# Altium PCB PCB.PcbDoc
Units mm, origin at the board's own origin, x right, y up, seen from the top; angles counter-clockwise.
Board outline 93.98 x 53.34 mm, 2 copper layers (Top Layer, Bottom Layer); 27 components, 34 nets, 165 pads, 42 vias.
Unrouted connection lines stored in the file: 2.
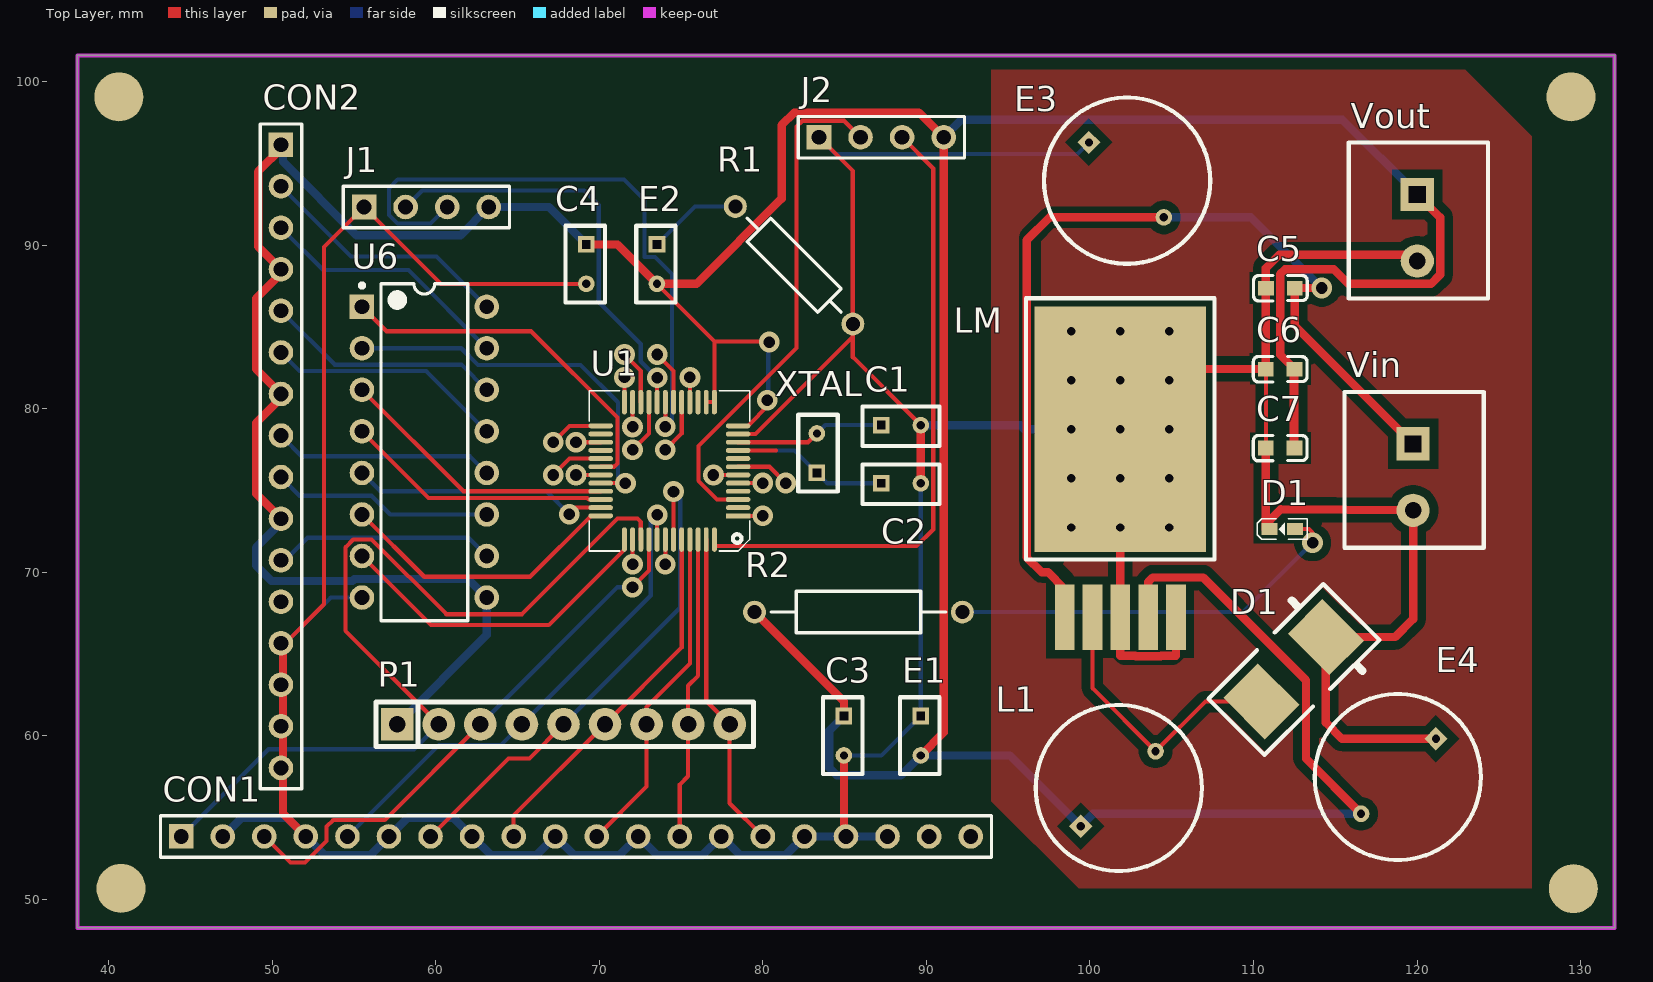
[diagram p0: Top Layer view]
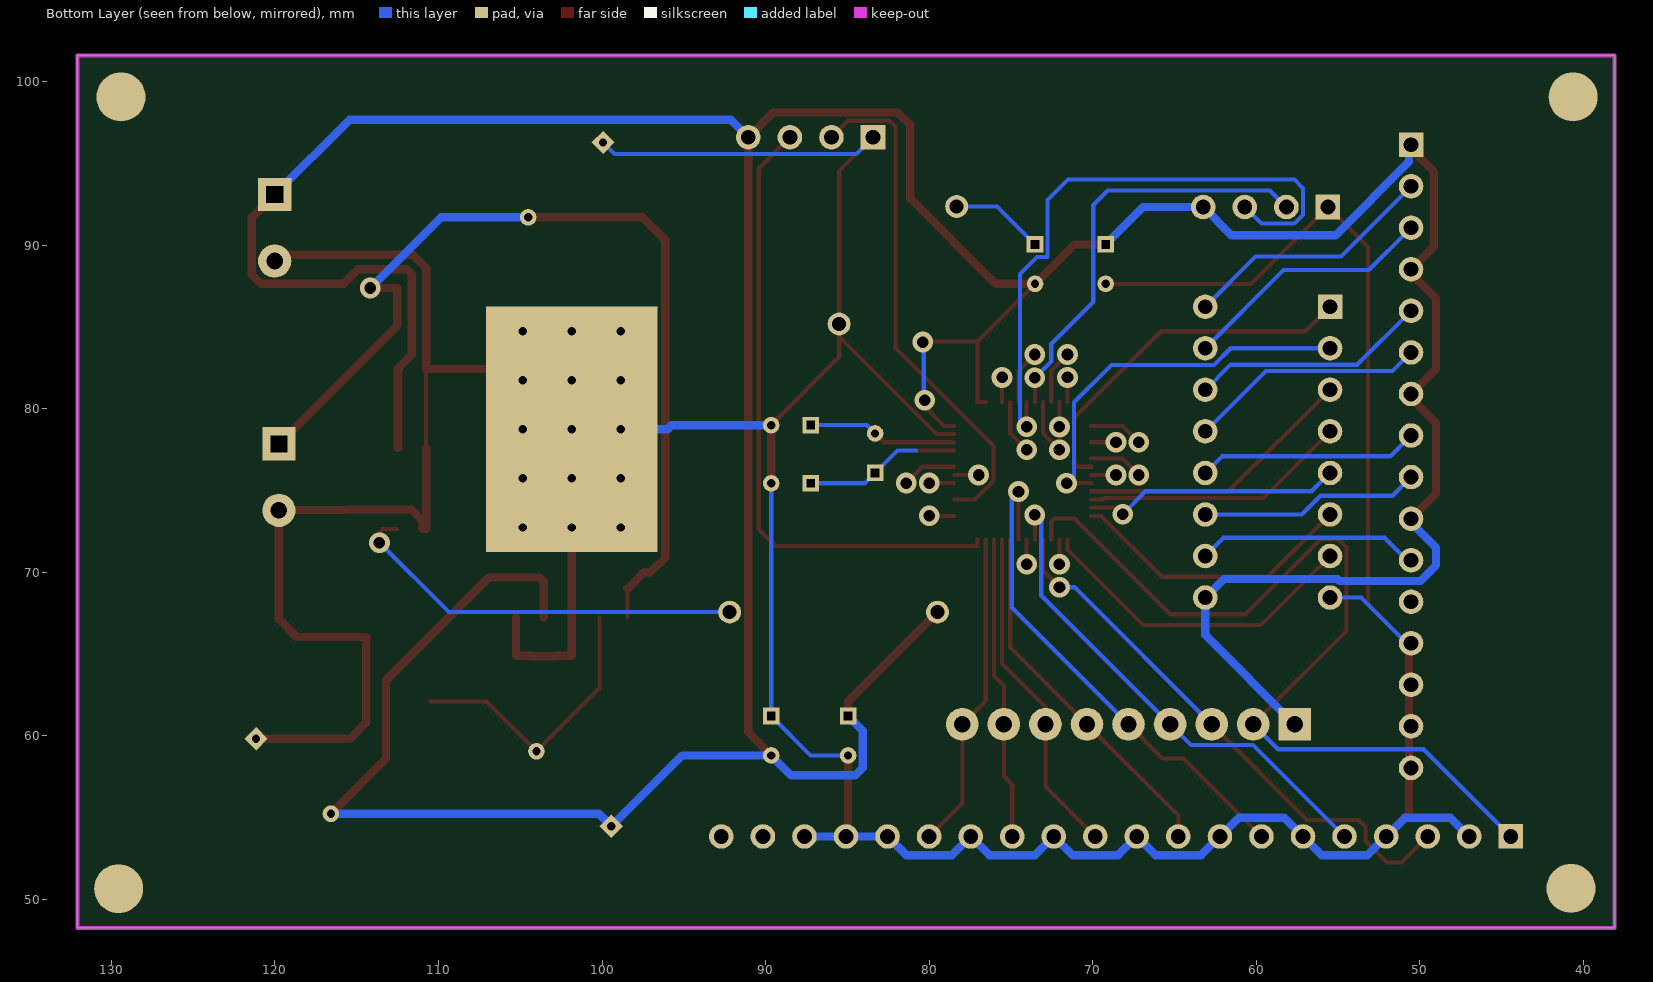
[diagram p1: Bottom Layer view, seen from below]

## Layer stack, top to bottom
Top Solder: solder mask 0.0102, Solder Resist, Dk 3.5
Top Layer: signal copper 0.0356
Dielectric 1: dielectric 0.32, FR-4, Dk 4.8
Bottom Layer: signal copper 0.0356
Bottom Solder: solder mask 0.0102, Solder Resist, Dk 3.5

## Board outline
38.1,48.26 38.1,101.6 132.08,101.6 132.08,48.26

## Design rules (kind name [scope] priority, off if disabled: settings)
Clearance [All] p1: gap=0.127 ignorepadtopadclearanceinfootprint=FALSE
PolygonConnect [All] p1: connectstyle=Relief reliefconductorwidth=0.254 reliefentries=4 polygonreliefangle="90 Angle" airgapwidth=0.254
RoutingVias [All] p1: holewidth=0.711 width=1.27 viastyle="Through Hole" minholewidth=0.711 minwidth=1.27 maxholewidth=0.711 maxwidth=1.27
SolderMaskExpansion [All] p1: expansion=0.102 istentingtop=FALSE
SupplyNets "Schematic Supply Nets_2" [InNet('GND')] p1: voltage=0.000
SupplyNets "Schematic Supply Nets" [InNet('9-24V')] p2: voltage=0.000
SupplyNets "Schematic Supply Nets_1" [InNet('RST')] p3: voltage=0.000
Width Width_2 [InNet('9-24V')] p1: maxlimit=2.54 minlimit=0.254 preferedwidth=0.508 minimp=50.000000 maximp=50.000000 favimp=50.000000
Width Width_1 [InNet('GND')] p2: maxlimit=2.54 minlimit=0.254 preferedwidth=0.508 minimp=50.000000 maximp=50.000000 favimp=50.000000
Width Width_RST [InNet('RST')] p3: maxlimit=2.54 minlimit=0.254 preferedwidth=0.508 minimp=50.000000 maximp=50.000000 favimp=50.000000
Width [All] p4: maxlimit=0.254 minlimit=0.254 preferedwidth=0.254
30 further rules are at their usual default settings.

## Components (designator, comment, footprint, x,y, rotation, side; value= is the part's Value field where it differs from the comment)
C1 "Cap" PCBComponent_1 89.662,78.994 r180 top value=30pF
C2 "Cap" PCBComponent_1 89.662,75.438 r180 top value=30pF
C3 "Cap" PCBComponent_1 84.963,58.801 r90 top value=0.1u
C4 "Cap" PCBComponent_1 69.215,87.63 r90 top value=0.1u
C5 "63V0.1u" 0603/C 111.646,87.376 r0 top
C6 "104" 0603/C 111.633,82.423 r0 top
C7 "103" 0603/C 111.633,77.597 r0 top
CON1 "Header 20" HDR1X20 44.45,53.848 r0 top
CON2 "Header 16" HDR1X16 50.546,96.139 r270 top
D1 "SS34" 100u 112.451,64.064 r225 top
D1 "LED3" LED/0603 111.76,72.644 r180 top
E1 "Cap Pol2" PCBComponent_1 89.662,58.801 r90 top value=100u
E2 "电解电容" PCBComponent_1 73.533,87.63 r90 top
E3 "Cap Pol2" Inductor 104.521,91.694 r315 top value="50v 100uF"
E4 "Cap Pol2" Inductor 116.578,55.237 r225 top value=100u
J1 "Header 4" HDR1X4 55.626,92.329 r0 top
J2 "Header 4" HDR1X4 83.439,96.599 r0 top
L1 "Inductor" Inductor 104.013,59.055 r45 top value=100uH
LM "LM2576" TO-263-5 98.454,67.24 r0 top
P1 "Header 9" P2.54/9PIN 67.818,60.706 r0 top
R1 "Res2" AXIAL-0.4 81.915,88.773 r135 top value=10K
R2 "Res Semi" AXIAL-0.5 85.852,67.564 r180 top value=2K
U1 "8A8K64S4A12" LQFP48 74.295,76.2 r180 top
U6 "MC1413" dip-16 59.309,77.343 r0 top
Vin "Vin" V 119.761,77.851 r0 top
Vout "Vout" V 120.015,93.091 r0 top
XTAL "4.0MHZ" PCBComponent_1 83.312,78.486 r270 top

## Footprints (in the part's own frame and the unit in brackets; to place one, negate y for a bottom-side part, rotate by r counter-clockwise, add the part's x,y. Pads: shape width x height; smd on the part's side, far side on the other; paste and mask are expansions set on the pad)
100u [mm]
  rect 3x3.6 smd: 1(-2.794,0) 2(2.775,0)
  silkscreen extent -4.98,-3.05 4.95,3.05
0603/C [mil]
  rect 38x35 smd: 1(-34.5,0) 2(34.5,0)
  silkscreen extent -64,-31 64,30, body extent -33,-16 30,16, height 12
AXIAL-0.4 [mm] "Axial Device, Thru-Hole; 2 Leads; 0.4 in Pin Spacing"
  round 1.4 hole 0.85: 1(-5.08,0) 2(5.08,0)
  silkscreen extent -4.06,-1.02 4.06,1.02
AXIAL-0.5 [mm] "Axial Device, Thru-Hole; 2 Leads; 0.5 in Pin Spacing"
  round 1.4 hole 0.85: 1(-6.35,0) 2(6.35,0)
  silkscreen extent -5.33,-1.27 5.33,1.27
dip-16 [mm] "DIP; 16 Leads; Row Spacing 7.62 mm; Pitch 2.54 mm"
  rect 1.5x1.5 hole 0.9: 1(-3.81,8.89)
  round 1.5 hole 0.9: 2(-3.81,6.35) 3(-3.81,3.81) 4(-3.81,1.27) 5(-3.81,-1.27) 6(-3.81,-3.81) 7(-3.81,-6.35) 8(-3.81,-8.89) 9(3.81,-8.89) 10(3.81,-6.35) 11(3.81,-3.81) 12(3.81,-1.27) 13(3.81,1.27) 14(3.81,3.81) 15(3.81,6.35) 16(3.81,8.89)
  silkscreen extent -3.93,-10.3 2.65,10.31, body extent -3.6,-10.28 3.6,10.28, height 5.08
HDR1X4 [mm]
  rect 1.5x1.5 hole 0.9: 1(0,0)
  round 1.5 hole 0.9: 2(2.54,0) 3(5.08,0) 4(7.62,0)
  silkscreen extent -1.27,-1.27 8.89,1.27
HDR1X16 [mm] "Connector; Header; 16 Position"
  rect 1.5x1.5 hole 0.9: 1(0,0)
  round 1.5 hole 0.9: 2(2.54,0) 3(5.08,0) 4(7.62,0) 5(10.16,0) 6(12.7,0) 7(15.24,0) 8(17.78,0) 9(20.32,0) 10(22.86,0) 11(25.4,0) 12(27.94,0) 13(30.48,0) 14(33.02,0) 15(35.56,0) 16(38.1,0)
  silkscreen extent -1.27,-1.27 39.37,1.27
HDR1X20 [mm] "Connector; Header; 20 Position"
  rect 1.5x1.5 hole 0.9: 1(0,0)
  round 1.5 hole 0.9: 2(2.54,0) 3(5.08,0) 4(7.62,0) 5(10.16,0) 6(12.7,0) 7(15.24,0) 8(17.78,0) 9(20.32,0) 10(22.86,0) 11(25.4,0) 12(27.94,0) 13(30.48,0) 14(33.02,0) 15(35.56,0) 16(38.1,0) 17(40.64,0) 18(43.18,0) 19(45.72,0) 20(48.26,0)
  silkscreen extent -1.27,-1.27 49.53,1.27
Inductor [mil]
  round 40 hole 20: 1(0,0)
  rect 40x40 hole 20: 2(-255,0)
  silkscreen extent -325,-200 75,200
LED/0603 [mil]
  rect 38x30 smd: 1(-31,0) 2(31,0)
  Top Layer pour cut-out: -59.29,24.17 59.21,24.17 59.21,-24.21 -59.29,-24.21 -59.29,24.17
  silkscreen extent -60,-25 60,25
LQFP48 [mm]
  rect 1.5x0.3 smd: 1(-4.2,2.75)
  oval 1.5x0.3 smd: 2(-4.2,2.25) 3(-4.2,1.75) 4(-4.2,1.25) 5(-4.2,0.75) 6(-4.2,0.25) 7(-4.2,-0.25) 8(-4.2,-0.75) 9(-4.2,-1.25) 10(-4.2,-1.75) 11(-4.2,-2.25) 12(-4.2,-2.75) 25(4.2,-2.75) 26(4.2,-2.25) 27(4.2,-1.75) 28(4.2,-1.25) 29(4.2,-0.75) 30(4.2,-0.25) 31(4.2,0.25) 32(4.2,0.75) 33(4.2,1.25) 34(4.2,1.75) 35(4.2,2.25) 36(4.2,2.75)
  oval 0.3x1.5 smd: 13(-2.75,-4.2) 14(-2.25,-4.2) 15(-1.75,-4.2) 16(-1.25,-4.2) 17(-0.75,-4.2) 18(-0.25,-4.2) 19(0.25,-4.2) 20(0.75,-4.2) 21(1.25,-4.2) 22(1.75,-4.2) 23(2.25,-4.2) 24(2.75,-4.2) 37(2.75,4.2) 38(2.25,4.2) 39(1.75,4.2) 40(1.25,4.2) 41(0.75,4.2) 42(0.25,4.2) 43(-0.25,4.2) 44(-0.75,4.2) 45(-1.25,4.2) 46(-1.75,4.2) 47(-2.25,4.2) 48(-2.75,4.2)
  silkscreen extent -4.9,-4.9 4.9,4.9
P2.54/9PIN [mm]
  rect 2x2 hole 1: 1(-10.16,0)
  round 2 hole 1: 2(-7.62,0) 3(-5.08,0) 4(-2.54,0) 5(0,0) 6(2.54,0) 7(5.08,0) 8(7.62,0) 9(10.16,0)
  silkscreen extent -11.46,-1.37 11.61,1.37
PCBComponent_1 [mil]
  round 40 hole 20: 1(0,0)
  rect 40x40 hole 20 square: 2(95,0)
  silkscreen extent -45,-45 140,50
TO-263-5 [mm]
  rect 1.2x4 smd: 1(0,0) 2(1.702,0) 3(3.404,0) 4(5.105,0) 5(6.807,0)
  rect 10.5x15 hole 0.508: 6(3.4,11.5)
  silkscreen extent -2.36,3.53 9.17,19.51
V [mil]
  rect 80x80 hole 40 square: 1(0,0)
  round 80 hole 40: 2(0,-160)
  silkscreen extent -165,-250 170,125

## Part data
C1 C2 C3 C4: "Capacitor", LatestRevisionDate=17-Jul-2002, LatestRevisionNote="Re-released for DXP Platform.", PackageDescription="Radial Cap, Thru-Hole; 2 Leads; 0.3 in Pin Spacing", PackageReference=RAD-0.3, Published=8-Jun-2000, Publisher="Altium Limited"
C5 C6 C7: library part 0603/C
CON1: "Header, 20-Pin", LatestRevisionDate=17-Jul-2002, LatestRevisionNote="Re-released for DXP Platform.", Publisher="Altium Limited"
CON2: "Header, 16-Pin", LatestRevisionDate=17-Jul-2002, LatestRevisionNote="Re-released for DXP Platform.", Publisher="Altium Limited"
D1: "Default Diode", Manufacturer="Generic Components", Class=Discrete, Published=08/06/2000, Publisher="Altium Hobart Technology Centre", SubClass="Diode - Switching"
D1: "Typical BLUE SiC LED", DatasheetVersion=16-Apr-2002, LatestRevisionDate=17-Dec-2003, LatestRevisionNote="PCB Footprint replaced.", PackageDescription="SM LED; 2 C-Bend Leads; Body 3.5 x 2.8 x 1.9 mm, inc leads (LxWxH typ)", PackageReference=3.5X2.8X1.9, PackageVersion=16-Apr-2002, Published=8-Jun-2000, Publisher="Altium Limited"
E1 E3 E4: "Polarized Capacitor (Axial)", LatestRevisionDate=17-Jul-2002, LatestRevisionNote="Re-released for DXP Platform.", PackageDescription="Polarized Capacitor; 2 Leads", PackageReference=POLAR0.8, Published=8-Jun-2000, Publisher="Altium Limited"
J1 J2: "Header, 4-Pin", LatestRevisionDate=17-Jul-2002, LatestRevisionNote="Re-released for DXP Platform.", Publisher="Altium Limited"
L1: Manufacturer="Generic Components", Class=Passive, Published=08/06/2000, Publisher="Altium Hobart Technology Centre", SubClass=Inductor
P1: "Header, 9-Pin", LatestRevisionDate=17-Jul-2002, LatestRevisionNote="Re-released for DXP Platform.", Publisher="Altium Limited"
R1: "Resistor", LatestRevisionDate=17-Jul-2002, LatestRevisionNote="Re-released for DXP Platform.", PackageDescription="Axial Device, Thru-Hole; 2 Leads; 0.4 in Pin Spacing", PackageReference=AXIAL-0.4, Published=8-Jun-2000, Publisher="Altium Limited"
R2: "Semiconductor Resistor", LatestRevisionDate=17-Jul-2002, LatestRevisionNote="Re-released for DXP Platform.", PackageDescription="Axial Device, Thru-Hole; 2 Leads; 0.5 in Pin Spacing", PackageReference=AXIAL-0.5, Published=8-Jun-2000, Publisher="Altium Limited"
XTAL: library part XTAL, "Crystal Oscillator", Manufacturer="Generic Components", Class=Oscillator, Published=08/06/2000, Publisher="Altium Hobart Technology Centre", SubClass="Crystal Oscillator"

## Free pads (board coordinates)
  round 3 all layers, no hole paste-2539.97: 3(40.64,99.06) 4(40.767,50.673) 5(129.413,99.06) 6(129.556,50.656)

## Via types
v1: diameter 1.27, hole 0.711, Top Layer to Bottom Layer, 28 vias
v2: diameter 0.889, hole 0.508, Top Layer to Bottom Layer, 14 vias

## Nets (pads, with @x,y where several pads share a name; then routed paths per layer and width w, separated by ;. In a path a pad name is that pad's centre, name@x,y a point inside that pad or via, vN(x,y) a via of type N, cw(c..) or ccw(c..) an arc to the next point about the centre after c; other vN are vias at no path point)
9-24V: C5.2 E3.1 LM.1 Vin.1 | length 58.8
  Top Layer w0.254: LM.1 LM.1@98.454,68.99
  Top Layer w0.508: LM.1@98.454,68.99 97.442,70.002 97.054,70.002 96.139,70.917 96.139,90.297 97.536,91.694 E3.1 ; v1(114.173,87.376) C5.2 112.522,85.09 Vin.1
  Bottom Layer w0.508: E3.1 109.855,91.694 v1(114.173,87.376)
D0: CON1.1 P1.2 U1.39 | length 55.5
  Top Layer w0.254: P1.2 54.483,66.421 54.483,71.526 54.966,72.009 56.083,72.009 60.655,67.437 65.278,67.437 71.12,73.279 72.339,73.279 72.545,73.073 U1.39
  Bottom Layer w0.254: CON1.1 49.784,59.182 58.674,59.182 P1.2
D1: CON1.3 P1.3 U1.40 | length 34
  Top Layer w0.254: CON1.3 51.13,52.248 52.019,52.248 53.34,53.569 53.34,54.458 53.746,54.864 56.896,54.864 P1.3 ; v1(72.034,69.088) 73.045,70.099 U1.40
  Bottom Layer w0.254: P1.3 71.12,69.088 v1(72.034,69.088)
D2: CON1.5 P1.4 U1.41 | length 31.2
  Top Layer w0.254: U1.41 v1(73.545,73.508)
  Bottom Layer w0.254: CON1.5 60.198,59.436 64.008,59.436 P1.4 73.152,68.58 73.152,73.115 v1(73.545,73.508)
D3: CON1.7 P1.5 U1.43 | length 31.2
  Top Layer w0.254: CON1.7 64.465,58.623 65.735,58.623 P1.5 ; U1.43 v1(74.545,74.93)
  Bottom Layer w0.254: P1.5 74.955,67.843 74.955,74.52 v1(74.545,74.93)
D4: CON1.9 P1.6 U1.44 | length 22.4
  Top Layer w0.254: CON1.9 64.77,55.118 P1.6 75.045,65.393 U1.44
D5: CON1.11 P1.7 U1.45 | length 20.5
  Top Layer w0.254: CON1.11 72.898,56.896 P1.7 72.898,61.773 75.545,64.42 U1.45
D6: CON1.13 P1.8 U1.46 | length 18.6
  Top Layer w0.254: CON1.13 74.93,57.023 75.438,57.531 P1.8 75.438,63.062 76.045,63.669 U1.46
D7: CON1.15 P1.9 U1.47 | length 19.6
  Top Layer w0.254: U1.47 76.545,62.139 P1.9 77.978,55.88 CON1.15
GND: C1.1 C2.1 C3.1 C4.1 C5.1 C6.1 C7.1 CON1.2 CON1.4 CON1.6 CON1.8 CON1.10 CON1.12 CON1.14 CON1.16 CON1.17 CON1.18 CON2.13 CON2.14 CON2.15 CON2.16 D1.1@114.427,66.04 D1.2@110.973,72.644 E1.2 E3.2 E4.2 J1.1 J2.1 LM.3 LM.5 LM.6 R1.1 U1.11 U6.8 Vin.2 Vout.2 | length 290.2
  Top Layer w0.254: CON2.13@50.673,65.532 53.188,68.047 53.188,89.891 J1.1 60.325,87.63 C4.1 ; U1.11 79.553,78.45 85.507,84.404 ; J2.1 85.507,94.531 R1.1 85.507,84.404 ; C1.1 85.507,83.149 85.507,84.404 ; C7.1 C6.1
  Top Layer w0.508: CON2.13@50.673,65.532 50.673,62.992 50.673,60.452 50.673,57.912 50.673,55.245 CON1.4 ; C3.1 84.963,53.975 CON1.17 ; C2.1 C1.1 ; LM.5 105.261,64.897 104.355,64.897 104.317,64.859 102.802,64.859 102.764,64.897 101.858,64.897 LM.3 101.858,72.974 101.854,72.974 v2(101.854,75.74) LM.6 v2(101.854,81.74) 101.854,82.423 C6.1 C5.1@110.757,87.376 ; C7.1 110.757,72.644 110.973,72.644 110.973,73.152 111.677,73.857 Vin.2 119.761,67.132 118.669,66.04 114.427,66.04 114.427,60.808 115.418,59.817 E4.2 ; C5.1 C5.1@110.757,87.376 ; Vout.2 119.634,89.408 111.569,89.408 110.757,88.595 C5.1@110.757,87.376
  Bottom Layer w0.254: CON2.13@50.673,65.532 53.594,68.453 U6.8 ; J2.1 84.458,95.58 99.247,95.58 E3.2 ; C3.1 87.249,58.801 E1.2 C2.1
  Bottom Layer w0.508: CON1.2 48.133,54.991 50.927,54.991 CON1.4 53.213,52.705 56.007,52.705 CON1.6 58.293,54.991 61.087,54.991 CON1.8 63.373,52.705 66.167,52.705 CON1.10 68.453,52.705 71.247,52.705 CON1.12 73.533,52.705 76.327,52.705 CON1.14 78.613,52.705 81.407,52.705 CON1.16 CON1.17 CON1.18 ; C1.1 95.758,78.994 96.012,78.74 v2(98.854,78.74) LM.6
  other v2: 98.854,72.74 101.854,72.74 104.854,72.74 98.854,75.74 104.854,75.74 104.854,78.74 98.854,81.74 104.854,81.74 98.854,84.74 101.854,84.74 104.854,84.74
NetCON2_2: CON2.2 U6.16 | length 15.4
  Bottom Layer w0.254: CON2.2@50.673,93.472 54.839,89.306 60.046,89.306 U6.16
NetCON2_3: CON2.3 U6.15 | length 15.4
  Bottom Layer w0.254: CON2.3@50.673,90.932 53.134,88.471 58.341,88.471 U6.15
NetCON2_5: CON2.5 U6.14 | length 14.4
  Bottom Layer w0.254: CON2.5@50.673,85.852 53.836,82.689 61.583,82.689 U6.14
NetCON2_6: CON2.6 U6.13 | length 14.4
  Bottom Layer w0.254: CON2.6@50.673,83.312 51.677,82.308 59.424,82.308 U6.13
NetCON2_8: CON2.8 U6.12 | length 13.3
  Bottom Layer w0.254: CON2.8@50.673,78.232 51.816,77.089 62.103,77.089 U6.12
NetCON2_9: CON2.9 U6.11 | length 13.3
  Bottom Layer w0.254: CON2.9@50.673,75.692 51.689,74.676 56.083,74.676 57.226,73.533 U6.11
NetCON2_11: CON2.11 U6.10 | length 13.5
  Bottom Layer w0.254: CON2.11@50.673,70.612 52.172,72.111 62.001,72.111 U6.10
NetD1_1: D1.1@112.547,72.644 R2.1 | length 24.9
  Top Layer w0.254: D1.1@112.547,72.644 113.386,72.644 113.614,72.415 v1(113.614,71.806)
  Bottom Layer w0.254: R2.1 109.372,67.564 v1(113.614,71.806)
NetD1_2: D1.2@110.489,62.102 L1.1 LM.2 | length 17.5
  Top Layer w0.254: LM.2 100.156,62.912 L1.1 107.06,62.102 D1.2@110.489,62.102
NetE2_2: E2.2 R1.2 | length 5.8
  Bottom Layer w0.254: E2.2 75.855,92.365 R1.2
P20: U1.30 U6.1 | length 22.3
  Top Layer w0.254: U6.1 56.998,84.734 65.837,84.734 71.12,79.451 71.12,76.653 70.917,76.45 U1.30
P21: U1.32 U6.2 | length 23.7
  Top Layer w0.254: U1.32 71.591,75.45 v1(71.603,75.438)
  Bottom Layer w0.254: U6.2 61.57,83.693 62.586,82.677 68.859,82.677 71.145,80.391 71.145,75.895 v1(71.603,75.438)
P22: U1.33 U6.3 | length 17.2
  Top Layer w0.254: U6.3 61.702,74.95 U1.33
P23: U1.34 U6.4 | length 16.3
  Top Layer w0.254: U6.4 59.563,74.549 69.268,74.549 69.367,74.45 U1.34
P24: U1.35 U6.5 | length 15.8
  Top Layer w0.254: v1(68.178,73.544) 68.584,73.95 U1.35
  Bottom Layer w0.254: U6.5 56.617,74.955 66.766,74.955 v1(68.178,73.544)
P25: U1.36 U6.6 | length 17.7
  Top Layer w0.254: U6.6 59.309,69.723 65.767,69.723 69.494,73.45 U1.36
P26: U1.37 U6.7 | length 20.3
  Top Layer w0.254: U6.7 59.715,66.777 66.922,66.777 71.545,71.399 U1.37
RST: C3.2 C4.2 C6.2 C7.2 CON2.1 CON2.4 CON2.7 CON2.10 E1.1 E2.1 E4.1 J1.4 J2.4 L1.2 LM.4 P1.1 R2.2 U1.12 U1.13 U1.14 U1.15 U6.9 Vout.1 | length 300.3
  Top Layer w0.254: E2.1 77.045,84.118 ; U1.14 U1.13 77.045,84.118 ; U1.12 79.095,78.95 80.391,80.246 v1@80.391,80.264 ; v1@80.518,84.118 77.045,84.118
  Top Layer w0.508: CON2.10 49.022,74.803 49.022,79.121 50.673,80.772 CON2.7 49.022,82.423 49.022,86.741 50.673,88.392 CON2.4 49.149,89.916 49.149,94.488 CON2.1@50.673,96.012 ; C4.2 71.12,90.043 E2.1 75.946,87.63 81.153,92.837 81.153,97.337 81.927,98.111 89.547,98.111 J2.4 91.059,60.198 E1.1 ; R2.2 84.963,62.103 C3.2 ; LM.4 103.559,69.4 103.835,69.676 106.93,69.676 113.208,63.398 113.208,58.607 E4.1 ; Vout.1 121.412,91.694 121.412,88.189 120.853,87.63 115.799,87.63 114.91,88.519 111.931,88.519 111.633,88.221 111.633,83.299 C6.2 ; C6.2 C7.2 112.471,77.597 112.471,82.423 C6.2
  Bottom Layer w0.254: v1(80.276,80.515) 80.339,80.579 80.339,84.008 v1(80.403,84.071)
  Bottom Layer w0.508: CON2.10@50.673,73.152 49.022,71.501 49.022,70.409 49.962,69.469 54.916,69.469 55.031,69.584 61.988,69.584 U6.9 63.119,66.167 P1.1 ; CON2.1@50.673,96.012 50.673,95.098 55.169,90.602 61.519,90.602 J1.4 66.929,92.329 C4.2 ; C3.2 84.074,60.325 84.074,58.039 84.531,57.582 88.443,57.582 E1.1 95.107,58.801 L1.2 100.195,55.237 E4.1 ; J2.4 92.123,97.663 115.443,97.663 Vout.1
RXD: J1.3 U1.19 | length 38.8
  Top Layer w0.254: v1(74.041,78.892) 74.045,78.896 U1.19
  Bottom Layer w0.254: J1.3 59.69,91.313 57.683,91.313 57.15,91.846 57.15,93.472 57.683,94.005 71.526,94.005 72.771,92.761 72.771,89.281 73.406,89.281 74.447,88.24 74.447,79.299 v1(74.041,78.892)
RXD2: J2.3 U1.48 | length 39
  Top Layer w0.254: U1.48 77.045,71.603 89.408,71.603 90.424,72.619 90.424,94.694 J2.3
TXD: J1.2 U1.20 | length 26.1
  Top Layer w0.254: U1.20 v1(73.545,81.89)
  Bottom Layer w0.254: J1.2 59.182,93.345 69.088,93.345 69.977,92.456 69.977,86.512 72.542,83.947 72.542,82.892 v1(73.545,81.89)
TXD2: J2.2 U1.3 | length 31.5
  Top Layer w0.254: U1.3 77.213,74.45 76.073,75.59 76.073,77.724 82.067,83.718 82.067,97.247 82.423,97.603 84.975,97.603 J2.2
X1: C2.2 U1.9 XTAL.2 | length 9.6
  Top Layer w0.254: U1.9 80.803,77.45
  Bottom Layer w0.254: 80.803,77.45 81.935,77.45 XTAL.2 83.947,75.438 C2.2
X2: C1.2 U1.10 XTAL.1 | length 9.2
  Top Layer w0.254: U1.10 82.776,77.95 XTAL.1
  Bottom Layer w0.254: XTAL.1 83.82,78.994 C1.2
pads on no net: CON1.19 CON1.20 CON2.12 U1.1 U1.2 U1.4 U1.5 U1.6 U1.7 U1.8 U1.16 U1.17 U1.18 U1.21 U1.22 U1.23 U1.24 U1.25 U1.26 U1.27 U1.28 U1.29 U1.31 U1.38 U1.42
copper on no net: | length 38.4
  Top Layer w0.254: v1(67.186,75.95) 68.186,76.95 70.095,76.95 ; v1(67.186,77.95) 68.186,78.95 70.095,78.95 ; v1(68.583,75.95) 70.095,75.95 ; v1(68.583,77.95) 70.095,77.95 ; 71.545,80.4 v1(71.545,81.912) ; v1(71.545,83.309) 72.545,82.309 72.545,80.4 ; v1(72.045,70.488) 72.045,72 ; v1(72.045,77.491) 73.045,78.491 73.045,80.4 ; v1(72.045,78.888) 72.045,80.4 ; v1(73.545,83.309) 74.545,82.309 74.545,80.4 ; v1(74.045,70.488) 74.045,72 ; v1(74.045,77.491) 75.045,78.491 75.045,80.4 ; 75.545,80.4 v1(75.545,81.912) ; v1(76.983,75.95) 78.495,75.95 ; 78.495,73.45 v1(80.007,73.45) ; 78.495,75.45 v1(80.007,75.45) ; 78.495,76.45 80.404,76.45 v1(81.404,75.45)

## Polygon pours and split planes (outlines as drawn)
no net on Top Layer "NONET_L01_P000" (solid, pour order 0): 93.98,100.711 93.98,56.007 99.314,50.673 127,50.673 127,96.647 122.936,100.711 121.92,100.711

## Keep-outs
Keep-Out Layer:
  lines w0.254: 38.1,48.26 132.08,48.26 132.08,101.6 43.18,101.6 38.1,101.6 38.1,48.26